# Altium PCB Mega2560_Custom.PcbDoc (part 4 of 6)
Units mil, origin at the board's own origin, x right, y up, seen from the top; angles counter-clockwise.
Board outline 4742.41 x 2889.95 mil, 2 copper layers (Top Layer, Bottom Layer), stack 57 mil thick; 213 components, 133 nets, 789 pads, 812 vias.
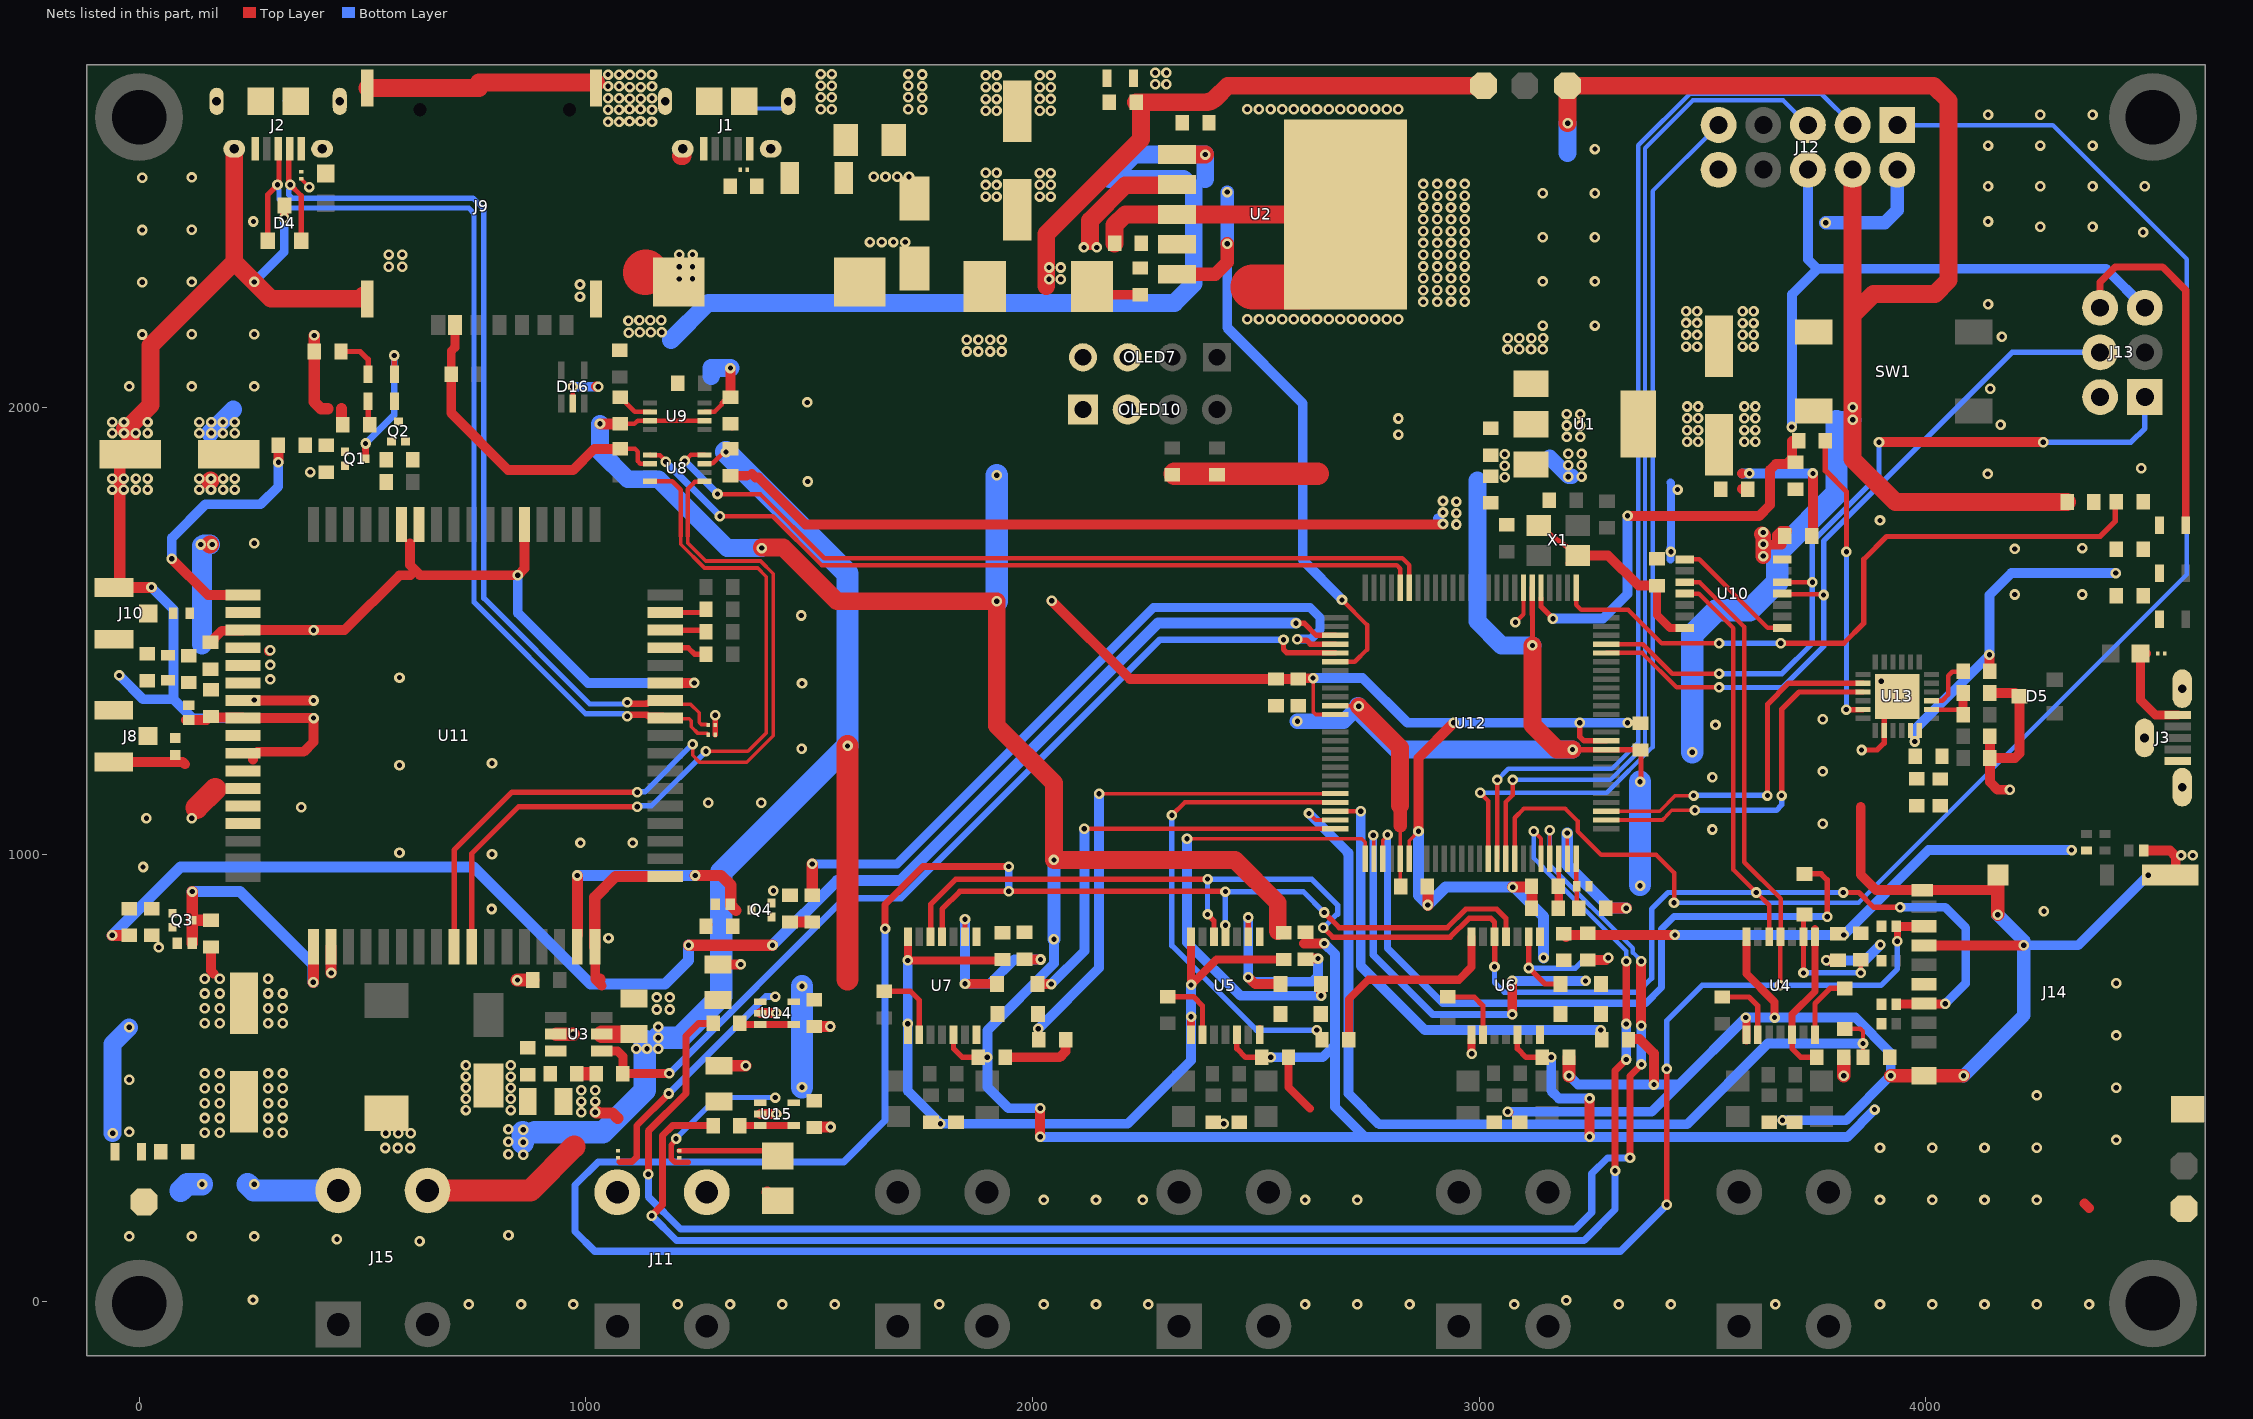
[diagram p2: the nets of this part, all layers, seen from the top]

## Part data (continued)
R48: library part RC0402FR-07100KL, "RES 100K OHM 1% 1/16W 0402", Case Code (Imperial)=0402, Case Code (Metric)=1005, Manufacturer=Yageo, Max Operating Temperature=155°C, Max Power Dissipation=63mW, Min Operating Temperature=-55°C, Package Quantity=1, Resistance=100kR, Resistance Tolerance=1%, Resistor Type="Thick Film", Supplier Part Number 1=603-RC0402FR-07100KL, Temperature Coefficient=100ppm/°C, Voltage Rating=50V, Case/Package=0402, Category="Chip SMD Resistors", ComponentLink1Description=https://datasheet.ciiva.com/11819/0900766b80c66297-11819452.pdf?src-supplier=RSComponents, ComponentLink1URL=https://datasheet.ciiva.com/11819/0900766b80c66297-11819452.pdf?src-supplier=RSComponents, ComponentLink2Description=https://datasheet.ciiva.com/22747/1018594-22747509.pdf?src-supplier=Element14, ComponentLink2URL=https://datasheet.ciiva.com/22747/1018594-22747509.pdf?src-supplier=Element14, ComponentLink3Description=https://datasheet.ciiva.com/2453/pyu-r-int-thick-7-2453362.pdf?src-supplier=Digi-Key, ComponentLink3URL=https://datasheet.ciiva.com/2453/pyu-r-int-thick-7-2453362.pdf?src-supplier=Digi-Key, ComponentLink4Description=https://datasheet.ciiva.com/2453/pyu-r-int-thick-7-2453363.pdf?src-supplier=Digi-Key, ComponentLink4URL=https://datasheet.ciiva.com/2453/pyu-r-int-thick-7-2453363.pdf?src-supplier=Digi-Key, ComponentLink5Description=https://datasheet.ciiva.com/2453/pyu-r-int-thick-7-2453361.pdf?src-supplier=Digi-Key, ComponentLink5URL=https://datasheet.ciiva.com/2453/pyu-r-int-thick-7-2453361.pdf?src-supplier=Digi-Key, ComponentLink6Description=https://datasheet.ciiva.com/12667/pyu-rc0402-51-rohs-l-6-r-12667930.pdf?src-supplier=Mouser, ComponentLink6URL=https://datasheet.ciiva.com/12667/pyu-rc0402-51-rohs-l-6-r-12667930.pdf?src-supplier=Mouser, ComponentLink7Description=https://datasheet.ciiva.com/15189/getdatasheetpartid-323696-15189334.pdf?src-supplier=Verical, ComponentLink7URL=https://datasheet.ciiva.com/15189/getdatasheetpartid-323696-15189334.pdf?src-supplier=Verical, Construction=Rectangular, Depth=0.5mm, Features="Moisture Resistant", Height=0.016inch, Lead Free="Lead Free", Length=0.039inch, Manufacturer Part Number=RC0402FR-07100KL, Military Standard=Not, Number of Terminations=2, Packaging="Tape and Reel", Power Rating=63mW, Pricing 1="1=0.10000, 10=0.01200, 50=0.01200, 100=0.00500, 1000=0.00300, 2500=0.00200, 10000=0.00100 (USD)", REACH SVHC="No SVHC", RoHS=Yes, RoHS Compliant=Yes, Series=RC, Stock 1=7759549, Supplier 1=Mouser, Technology="THICK FILM", Termination=SMD/SMT, Tolerance=1%, Width=0.02inch, Working Voltage=50V
R50: library part ARG06BTC2500, "±0.1% 250Ω 1206 Chip Resistor - Surface Mount ROHS", LCSC Part Number=C3033906, Manufacturer="Viking Tech", Package=1206, ComponentLink1Description=LCSC, ComponentLink1URL=https://www.lcsc.com/product-detail/Chip-Resistor-Surface-Mount_Viking-Tech-ARG06BTC2500_C3033906.html, Item Type=Resistor, Manufacturer Part Number=ARG06BTC2500
R51 R52: library part RC0603FR-07680RL, "RES SMD 680 OHM 1% 1/10W 0603", LCSC Part Number=C112310, Manufacturer=Yageo, Package=0603, ComponentLink4Description=LCSC, ComponentLink4URL=https://www.lcsc.com/product-detail/Chip-Resistor-Surface-Mount_YAGEO-RC0603FR-07680RL_C112310.html, Item Type=Resistor, Manufacturer Part Number=RC0603FR-07680RL
SB1 SB2: "Solder Bridge ON"
SB8: "Solder Bridge ON", Manufacturer Part Number="Solder Bridge", Item Type="Solder Bridge"
SW1: library part TL3301NF160QG, "SWITCH TACTILE SPST-NO 0.05A 12V", LCSC Part Number=C273526, Manufacturer=E-Switch, Manufacturer Part Number=TL3301NF160QG/TR, Package="SMD (6.00mm x 6.00mm)", ComponentLink1Description=LCSC, ComponentLink1URL=https://www.lcsc.com/product-detail/Tactile-Switches_E-Switch-TL3301NF160QG_C273526.html
U1: "15V 1.3V @ 800mA Fixed 3.3V SOT-223 Linear Voltage Regulators (LDO) ROHS", LCSC Part Number=C92102, Manufacturer="Diodes Incorporated", Package=SOT-223, ComponentLink1Description=LCSC, ComponentLink1URL=https://lcsc.com/product-detail/Linear-Voltage-Regulators-LDO_Diodes-Incorporated-AZ1117CH-3-3TRG1_C92102.html, Item Type=IC, Manufacturer Part Number=AZ1117CH-3.3TRG1
U2: "IC REG BUCK ADJ 3A TO263-5", Case/Package=TO-263, LCSC Part Number=C1355333, Manufacturer="TI National Semiconductor", Max Input Voltage=40V, Max Operating Temperature=125°C, Max Output current=3A, Max Output Voltage=37V, Min Input Voltage=4.5V, Min Operating Temperature=-40°C, Min Output Voltage=1.2V, Quiescent Current=5mA, Supplier Part Number 1=926-LM2596S-ADJ/NOPB, Switching Frequency=173kHz, Category="Voltage Regulators - Switching", ComponentLink1Description=https://datasheet.ciiva.com/27056/2051160-27056491.pdf?src-supplier=Jameco, ComponentLink1URL=https://datasheet.ciiva.com/27056/2051160-27056491.pdf?src-supplier=Jameco, ComponentLink2Description=https://datasheet.ciiva.com/15112/getdatasheetpartid-55559-15112636.pdf?src-supplier=Verical, ComponentLink2URL=https://datasheet.ciiva.com/15112/getdatasheetpartid-55559-15112636.pdf?src-supplier=Verical, ComponentLink3Description=https://datasheet.ciiva.com/41457/001013814-da-01-en-ic-reg-buc-lm2596s-adj-nopb-to-263-5-tid-41457756.pdf?src-supplier=Conrad, ComponentLink3URL=https://datasheet.ciiva.com/41457/001013814-da-01-en-ic-reg-buc-lm2596s-adj-nopb-to-263-5-tid-41457756.pdf?src-supplier=Conrad, ComponentLink4Description=https://datasheet.ciiva.com/22669/1874590-22669464.pdf?src-supplier=Element14, ComponentLink4URL=https://datasheet.ciiva.com/22669/1874590-22669464.pdf?src-supplier=Element14, ComponentLink5Description=https://datasheet.ciiva.com/14150/jqlm2596x-xx-e-14150653.pdf?src-supplier=Distrelec, ComponentLink5URL=https://datasheet.ciiva.com/14150/jqlm2596x-xx-e-14150653.pdf?src-supplier=Distrelec, ComponentLink6Description=https://datasheet.ciiva.com/6596/lm2596-6596342.pdf?src-supplier=Digi-Key, ComponentLink6URL=https://datasheet.ciiva.com/6596/lm2596-6596342.pdf?src-supplier=Digi-Key, Contact Plating=Tin,Matte, Efficiency=73%, Height=4.57mm, Item Type=IC, Lead Free="Contains Lead", Length=10.16mm, Manufacturer Part Number=LM2596S-ADJ/NOPB, Mount="Surface Mount", Number of Outputs=1, Number of Pins=5, Operating Supply Voltage=40V, Output Current=3A, Output Type=Adjustable, Output Voltage=37V, Packaging=Rail/Tube, Pricing 1="1=7.15000, 10=6.46000, 50=6.16000, 100=5.34000, 1000=5.10000, 10000=5.10000 (USD)", Radiation Hardening=No, Reach SVHC Compliant=Yes, RoHS=Yes, RoHS Compliant=Yes, Series=LM2596, Supplier 1=Mouser, Weight=0.056128oz, Width=8.64mm
U3: "boost converterType 1 Boost 28V 2V~24V 1.2MHz SOT-23-6 DC-DC Converters ROHS", LCSC Part Number=C84817, Manufacturer="XI'AN Aerosemi Tech", Package=SOT-23-6, ComponentLink1Description=LCSC, ComponentLink1URL=https://www.lcsc.com/product-detail/DC-DC-Converters_XI-AN-Aerosemi-Tech-MT3608_C84817.html, Item Type=IC, Manufacturer Part Number=MT3608
U4 U5 U6 U7: "IC CONV THERMOCOUPLE 14TSSOP", Case/Package=TSSOP, LCSC Part Number=C2653162, Manufacturer=Maxim, Max Operating Temperature=125°C, Min Operating Temperature=-55°C, Operating Supply Current=1.2mA, Category="Interface ICs", ComponentLink1Description=https://media.digikey.com/pdf/Data%20Sheets/Maxim%20PDFs/PartNumberBreakdown_ds.pdf?src-supplier=Digi-Key, ComponentLink1URL=https://media.digikey.com/pdf/Data%20Sheets/Maxim%20PDFs/PartNumberBreakdown_ds.pdf?src-supplier=Digi-Key, ComponentLink2Description=http://datasheets.maximintegrated.com/en/ds/MAX31856.pdf?src-supplier=Avnet, ComponentLink2URL=http://datasheets.maximintegrated.com/en/ds/MAX31856.pdf?src-supplier=Avnet, Interface=SPI, Item Type=IC, Manufacturer Part Number=MAX31856MUD+T, Mount="Surface Mount", Number of Pins=14, Output Type=Digital, Packaging="Tape and Reel", Pricing 1="1=10.21890, 10=9.52090, 25=9.06320, 100=7.80510, 250=7.38990, 500=6.66890, 1000=6.39750, 3000=6.32960 (USD)", RoHS=Yes, RoHS Compliant=Yes, Stock 1=2890, Supplier 1="Arrow Electronics", Supplier Part Number 1=MAX31856MUD+T
U8: "IC TRNSLTR BIDIRECTIONAL US8", Case/Package=VSSOP, High Level Output Current=-20uA, LCSC Part Number=C2677366, Low Level Output Current=20uA, Manufacturer="Texas Instruments", Max Operating Temperature=85°C, Max Supply Voltage=5.5V, Min Operating Temperature=-40°C, Min Supply Voltage=1.65V, Output Current=50mA, Package Quantity=1, Category="Integrated Circuits (ICs)", ComponentLink1Description=https://datasheet.ciiva.com/4226/sces641b-4226901.pdf?src-supplier=Arrow+Electronics, ComponentLink1URL=https://datasheet.ciiva.com/4226/sces641b-4226901.pdf?src-supplier=Arrow+Electronics, ComponentLink2Description=https://datasheet.ciiva.com/15096/getdatasheetpartid-226009-15096242.pdf?src-supplier=Verical, ComponentLink2URL=https://datasheet.ciiva.com/15096/getdatasheetpartid-226009-15096242.pdf?src-supplier=Verical, ComponentLink3Description=https://datasheet.ciiva.com/14287/txb0102-14287498.pdf?src-supplier=Avnet, ComponentLink3URL=https://datasheet.ciiva.com/14287/txb0102-14287498.pdf?src-supplier=Avnet, ComponentLink4Description=https://datasheet.ciiva.com/14287/txb0102-14287370.pdf?src-supplier=Avnet, ComponentLink4URL=https://datasheet.ciiva.com/14287/txb0102-14287370.pdf?src-supplier=Avnet, ComponentLink5Description=https://datasheet.ciiva.com/6619/txb0102-6619255.pdf?src-supplier=Digi-Key, ComponentLink5URL=https://datasheet.ciiva.com/6619/txb0102-6619255.pdf?src-supplier=Digi-Key, ComponentLink6Description=https://datasheet.ciiva.com/6619/txb0102-6619256.pdf?src-supplier=Digi-Key, ComponentLink6URL=https://datasheet.ciiva.com/6619/txb0102-6619256.pdf?src-supplier=Digi-Key, ComponentLink7Description=https://datasheet.ciiva.com/6619/txb0102-6619257.pdf?src-supplier=Digi-Key, ComponentLink7URL=https://datasheet.ciiva.com/6619/txb0102-6619257.pdf?src-supplier=Digi-Key, Contact Plating=Gold, Data Rate=100Mbps, Height=0.85mm, Item Type=IC, Lead Free="Lead Free", Length=2.3mm, Logic Function=Translator, Manufacturer Part Number=TXB0102DCUT, Mount="Surface Mount", Number of Bits=2, Number of Channels=2, Number of Inputs=2, Number of Pins=8, Output Type=3-STATE, Packaging="Tape and Reel", Pricing 1="1=0.79330, 10=0.66470, 25=0.65820, 250=0.37450, 500=0.36200, 1000=0.29770, 2500=0.28440 (USD)", Propagation Delay=31ns, Radiation Hardening=No, REACH SVHC="No SVHC", RoHS=Yes, RoHS Compliant=Yes, Series=-, Stock 1=10, Supplier 1="Arrow Electronics", Supplier Part Number 1=TXB0102DCUT, Turn-On Delay Time=7.4ns, Weight=0.000339oz, Width=2mm
U9: "IC TRANSLTR BIDIRECTIONAL 8VSSOP", Case/Package=VSSOP, LCSC Part Number=C53434, Manufacturer="Texas Instruments", Max Operating Temperature=85°C, Max Supply Voltage=3.6V, Min Operating Temperature=-40°C, Min Supply Voltage=1.65V, Nominal Supply Voltage=1.8V, Package Body Material=Plastic, Package Shape=Rectangular, Package Style="SMALL OUTLINE, VERY THIN PROFILE, SHRINK PITCHMeter", Peak Reflow Temperature (Cel)=260°C, Power Supplies=1.8/3.3,2.5/5V, Supplier Part Number 1=595-TXS0102DCUR, Supply Voltage1-Max=5.5V, Supply Voltage1-Min=2.3V, Supply Voltage1-Nom=2.5V, Temperature Grade=INDUSTRIAL, Category="Voltage Level Shifters", Channels=1, ComponentLink1Description=https://www.ti.com:443/lit/ds/symlink/txs0102.pdf?src-supplier=IHS+Markit, ComponentLink1URL=https://www.ti.com:443/lit/ds/symlink/txs0102.pdf?src-supplier=IHS+Markit, ComponentLink2Description=https://datasheet.ciiva.com/22653/1846850-22653373.pdf?src-supplier=Farnell, ComponentLink2URL=https://datasheet.ciiva.com/22653/1846850-22653373.pdf?src-supplier=Farnell, ComponentLink3Description=https://datasheet.ciiva.com/15096/getdatasheetpartid-118249-15096172.pdf?src-supplier=Verical, ComponentLink3URL=https://datasheet.ciiva.com/15096/getdatasheetpartid-118249-15096172.pdf?src-supplier=Verical, ComponentLink4Description=https://datasheet.ciiva.com/1508/1857232-1508821.pdf?src-supplier=Element14, ComponentLink4URL=https://datasheet.ciiva.com/1508/1857232-1508821.pdf?src-supplier=Element14, ComponentLink5Description=https://datasheet.ciiva.com/28499/1863639-28499676.pdf?src-supplier=Element14, ComponentLink5URL=https://datasheet.ciiva.com/28499/1863639-28499676.pdf?src-supplier=Element14, ComponentLink6Description=https://datasheet.ciiva.com/46395/1863639-46395871.pdf?src-supplier=Element14, ComponentLink6URL=https://datasheet.ciiva.com/46395/1863639-46395871.pdf?src-supplier=Element14, ComponentLink7Description=https://datasheet.ciiva.com/1899/txs0102-1899369.pdf?src-supplier=Digi-Key, ComponentLink7URL=https://datasheet.ciiva.com/1899/txs0102-1899369.pdf?src-supplier=Digi-Key, ComponentLink8Description=https://datasheet.ciiva.com/1899/txs0102-1899368.pdf?src-supplier=Digi-Key, ComponentLink8URL=https://datasheet.ciiva.com/1899/txs0102-1899368.pdf?src-supplier=Digi-Key, ComponentLink9Description=https://datasheet.ciiva.com/1899/txs0102-1899370.pdf?src-supplier=Digi-Key, ComponentLink9URL=https://datasheet.ciiva.com/1899/txs0102-1899370.pdf?src-supplier=Digi-Key, ComponentLink10Description=https://datasheet.ciiva.com/14287/txs0102-14287516.pdf?src-supplier=Avnet, ComponentLink10URL=https://datasheet.ciiva.com/14287/txs0102-14287516.pdf?src-supplier=Avnet, Height - Seated (Max)=0.9mm, Interface IC Type="INTERFACE CIRCUIT", Item Type=IC, JESD-30 Code=R-PDSO-G8, JESD-609 Code=e4, Length=2.3mm, Manufacturer Part Number=TXS0102DCUR, Moisture Sensitivity Level=1, Pins=8, Pricing 1="1=0.93000, 10=0.83300, 50=0.79000, 100=0.64900, 1000=0.42300, 10000=0.40900 (USD)", Qualification Status="Not Qualified", Reach SVHC Compliant=Yes, RoHS=Yes, RoHS Compliant=Yes, Stock 1=246792, Supplier 1=Mouser, Surface Mount=Yes, Terminal Finish=Nickel, Terminal Form="Gull Wing", Terminal Pitch=0.5mm, Terminal Position=DUAL, Width=2mm
U10: "IC TRANSLATOR BIDIR 14TSSOP", Case/Package=TSSOP, High Level Output Current=-20uA, LCSC Part Number=C60708, Low Level Output Current=20uA, Manufacturer="Texas Instruments", Max Operating Temperature=85°C, Max Supply Voltage=5.5V, Min Operating Temperature=-40°C, Min Supply Voltage=1.2V, Nominal Supply Current=5uA, Package Quantity=2000, Quiescent Current=3.5uA, Category="Voltage Level Shifters", Channel Type=Bidirectional, ComponentLink1Description=https://datasheet.ciiva.com/1508/1633692-1508723.pdf?src-supplier=Element14, ComponentLink1URL=https://datasheet.ciiva.com/1508/1633692-1508723.pdf?src-supplier=Element14, ComponentLink2Description=https://datasheet.ciiva.com/22653/1845221-22653354.pdf?src-supplier=Farnell, ComponentLink2URL=https://datasheet.ciiva.com/22653/1845221-22653354.pdf?src-supplier=Farnell, ComponentLink3Description=https://datasheet.ciiva.com/15096/getdatasheetpartid-48026-15096134.pdf?src-supplier=Verical, ComponentLink3URL=https://datasheet.ciiva.com/15096/getdatasheetpartid-48026-15096134.pdf?src-supplier=Verical, ComponentLink4Description=https://datasheet.ciiva.com/1508/1849862-1508724.pdf?src-supplier=Element14, ComponentLink4URL=https://datasheet.ciiva.com/1508/1849862-1508724.pdf?src-supplier=Element14, ComponentLink5Description=https://datasheet.ciiva.com/46395/1864432-46395886.pdf?src-supplier=Element14, ComponentLink5URL=https://datasheet.ciiva.com/46395/1864432-46395886.pdf?src-supplier=Element14, ComponentLink6Description=https://datasheet.ciiva.com/1899/txb0104-1899515.pdf?src-supplier=Digi-Key, ComponentLink6URL=https://datasheet.ciiva.com/1899/txb0104-1899515.pdf?src-supplier=Digi-Key, ComponentLink7Description=https://datasheet.ciiva.com/1899/txb0104-1899514.pdf?src-supplier=Digi-Key, ComponentLink7URL=https://datasheet.ciiva.com/1899/txb0104-1899514.pdf?src-supplier=Digi-Key, ComponentLink8Description=https://datasheet.ciiva.com/1899/txb0104-1899516.pdf?src-supplier=Digi-Key, ComponentLink8URL=https://datasheet.ciiva.com/1899/txb0104-1899516.pdf?src-supplier=Digi-Key, ComponentLink9Description=https://datasheet.ciiva.com/14287/txb0104-14287375.pdf?src-supplier=Avnet, ComponentLink9URL=https://datasheet.ciiva.com/14287/txb0104-14287375.pdf?src-supplier=Avnet, Data Rate=100Mbps, Height=1.15mm, Item Type=IC, Lead Free="Lead Free", Length=5mm, Logic Function=Translator, Manufacturer Part Number=TXB0104PWR, Mount="Surface Mount", Number of Bits=4, Number of Channels=4, Number of Circuits=1, Number of Inputs=4, Number of Pins=14, Output Current=20uA, Output Type=3-STATE, Packaging="Tape and Reel", Pricing 1="1=1.50780, 10=1.39060, 25=1.29340, 100=1.11370, 250=1.03790, 500=0.97230, 1000=0.92410 (USD)", Propagation Delay=31ns, Radiation Hardening=No, Reach SVHC Compliant=Yes, RoHS=Yes, RoHS Compliant=Yes, Series=-, Stock 1=1658, Supplier 1="Arrow Electronics", Supplier Part Number 1=TXB0104PWR, Turn-On Delay Time=7.4ns, Weight=0.002018oz, Width=4.4mm
U11: "eMTC CAT-M1 Module 700MHz/1700MHz/1900MHz 3.8V LCC", LCSC Part Number=C126271, Manufacturer=Simcom, Category=Uncategorized, ComponentLink1Description=LCSC, ComponentLink1URL=https://www.lcsc.com/product-detail/2G-3G-4G-5G-Modules_SIMCom-Wireless-Solutions-SIM7000A_C126271.html, Item Type=Module, Manufacturer Part Number=SIM7000A, Pricing 1="50=18.60000, 100=17.40000, 200=16.20000, 300=15.60000, 400=15.00000, 500=15.00000, 5000=14.64000 (USD)", RoHS=No, Supplier 1=Avnet, Supplier Part Number 1=SIM7000A
U12: "IC MCU 8BIT 256KB FLASH 100TQFP", Case/Package=A, Frequency=16MHz, LCSC Part Number=C22460, Manufacturer=Microchip, Max Operating Temperature=85°C, Max Supply Voltage=5.5V, Min Operating Temperature=-40°C, Min Supply Voltage=4.5V, Operating Supply Voltage=5V, Package Body Material=Plastic, Package Code=TFQFP, Package Quantity=90, Package Shape=Square, Peak Reflow Temperature (Cel)=260°C, Supplier Part Number 1=68T2776, Temperature Grade=INDUSTRIAL, Time @ Peak Reflow Temperature-Max (s)=40s, Access Time=16us, Category=Uncategorized, ComponentLink1Description=https://datasheet.ciiva.com/22651/1698622-22651116.pdf?src-supplier=Farnell, ComponentLink1URL=https://datasheet.ciiva.com/22651/1698622-22651116.pdf?src-supplier=Farnell, ComponentLink2Description=https://datasheet.ciiva.com/15122/getdatasheetpartid-134542-15122545.pdf?src-supplier=Verical, ComponentLink2URL=https://datasheet.ciiva.com/15122/getdatasheetpartid-134542-15122545.pdf?src-supplier=Verical, ComponentLink3Description=https://datasheet.ciiva.com/29119/154804-da-01-en-atmega2560-16au-tqfp-100-29119580.pdf?src-supplier=Conrad, ComponentLink3URL=https://datasheet.ciiva.com/29119/154804-da-01-en-atmega2560-16au-tqfp-100-29119580.pdf?src-supplier=Conrad, ComponentLink4Description=https://datasheet.ciiva.com/6640/atmel-2549-8-bit-avr-microcontroller-atmega640-1280-1281-2560-2561-summary-6640293.pdf?src-supplier=Digi-Key, ComponentLink4URL=https://datasheet.ciiva.com/6640/atmel-2549-8-bit-avr-microcontroller-atmega640-1280-1281-2560-2561-summary-6640293.pdf?src-supplier=Digi-Key, ComponentLink5Description=https://datasheet.ciiva.com/1162/33246-1162139.pdf?src-supplier=Farnell, ComponentLink5URL=https://datasheet.ciiva.com/1162/33246-1162139.pdf?src-supplier=Farnell, ComponentLink6Description=https://datasheet.ciiva.com/1157/1817551-1157521.pdf?src-supplier=Element14, ComponentLink6URL=https://datasheet.ciiva.com/1157/1817551-1157521.pdf?src-supplier=Element14, ComponentLink7Description=https://datasheet.ciiva.com/16936/70123980-16936268.pdf?src-supplier=Allied+Electronics, ComponentLink7URL=https://datasheet.ciiva.com/16936/70123980-16936268.pdf?src-supplier=Allied+Electronics, Core Architecture=AVR, Data Bus Width=8b, Density=256KB, Height=1.05mm, Interface=I2C,SPI,UART,USART,EBI/EMI,2-Wire, Item Type=IC, JESD-30 Code=S-PQFP-G100, Lead Free="Lead Free", Length=14.1mm, Manufacturer Part Number=ATMEGA2560-16AU, Max Frequency=16MHz, Memory Size=256KB, Memory Type=FLASH, Moisture Sensitivity Level=3, Mount="Surface Mount", Number of ADC Channels=16, Number of I2C Channels=1, Number of I/O Lines=86, Number of I/Os=86, Number of Pins=100, Number of Programmable I/O=86, Number of PWM Channels=12, Number of SPI Channels=1, Number of Terminals/Pins=100, Number of Timers/Counters=6, Oscillator Type=Internal, Packaging=Tray, Peripherals="PWM,Brown-out Detect/Reset,POR,WDT", Pricing 1="1=12.70000 (USD)", Radiation Hardening=No, RAM Size=8KB, Reach SVHC Compliant=Yes, RoHS=Yes, RoHS Compliant=Yes, Series="AVR® ATmega", Stock 1=4, Supplier 1=Avnet, Surface Mount=Yes, Technology=CMOS, Terminal Finish=Tin, Terminal Form="Gull Wing", Terminal Position=QUAD, Termination=SMD/SMT, Watchdog Timer=Yes, Width=14.1mm
U13: "IC USB TO UART BRIDGE QFN24", LCSC Part Number=C969151, Manufacturer="Silicon Labs", Category="Interface ICs", ComponentLink1Description=https://www.silabs.com/documents/public/data-sheets/cp2102n-datasheet.pdf?src-supplier=Digi-Key, ComponentLink1URL=https://www.silabs.com/documents/public/data-sheets/cp2102n-datasheet.pdf?src-supplier=Digi-Key, Item Type=IC, Manufacturer Part Number=CP2102N-A02-GQFN24R, Pricing 1="1=2.66900, 10=2.64300, 25=2.61700, 100=2.59000, 250=2.56400 (USD)", RoHS=Yes, Stock 1=321, Supplier 1="Arrow Electronics", Supplier Part Number 1=CP2102N-A02-GQFN24R
U14 U15: "IC OPAMP GP 1 CIRCUIT SC70-5", LCSC Part Number=C4366617, Manufacturer="Texas Instruments", Supplier Part Number 1=595-TLV9301IDCKR, Category="Amplifiers - Op Amps, Buffer, Instrumentation", Item Type=IC, Manufacturer Part Number=TLV9301IDCKR, Pricing 1="1=0.67, 10=0.562, 50=0.562, 100=0.445, 1000=0.284, 10000=0.283 (USD)", RoHS=No, Stock 1=29098, Supplier 1=Mouser
X1: "16MHz SMD Crystal Resonator 9pF ±10ppm ±30ppm -40℃~+85℃ SMD3225-4P Crystals ROHS", LCSC Part Number=C13738, Manufacturer="Yangxing Tech", Package=SMD3225-4P, ComponentLink1Description=LCSC, ComponentLink1URL=https://www.lcsc.com/product-detail/Crystals_Yangxing-Tech-X322516MLB4SI_C13738.html, Item Type=Crystal, Manufacturer Part Number=X322516MLB4SI

## Free pads (board coordinates)
  round 196.85 hole 122.05: MH(0,-5) MH(0,2650.77) MH(4508.05,2650.77) MH(4508.05,-5)

## Via types
v1: diameter 23.62, hole 11.81, Top Layer to Bottom Layer, 812 vias

## Nets (pads, with @x,y where several pads share a name; then routed paths per layer and width w, separated by ;. In a path a pad name is that pad's centre, name@x,y a point inside that pad or via, vN(x,y) a via of type N, cw(c..) or ccw(c..) an arc to the next point about the centre after c; other vN are vias at no path point)
3.3V: C6.1 C7.2 C9.2 C10.2 C12.2 C13.2 C19.2 C20.2 C21.2 C22.2 C30.1 C32.1 J14.4 OLED7.3 OLED10.2 P6.1 R8.2 R9.2 R14.2 R15.2 R36.2 R37.2 R48.2 U1.2 U1.4 U4.5 U4.8 U5.5 U5.8 U6.5 U6.8 U7.5 U7.8 U9.3 U9.6 U10.1 U10.8 | length 9087.4
  Top Layer w8: v1@3158,546 v1(3161,546) ; C30.1@3396.82,1664.95 C30.1@3401.05,1660.72
  Top Layer w10: C32.1@1076.82,1963.95 1108.82,1963.95 1115.98,1971.11 U9.3@1143.8,1971.11 U9.6@1265.85,1971.11 ; U10.1@3459.57,1660.72 3492.19,1660.72 3645.74,1507.18 U10.8@3678.07,1507.18
  Top Layer w12: U7.5@1823.23,596.91 1823.23,565.59 1842.82,546 C22.2@1878.82,546 ; U5.5@2457.41,596.91 2457.41,565.59 2477,546 C13.2@2513,546 ; U6.5@3085.27,596.91 3085.27,565.59 3104.86,546 C20.2@3140.86,546 ; U4.5@3700.27,583.91 3700.27,565.59 3719.86,546 C9.2@3755.86,546
  Top Layer w16: U4.5@3700.27,583.91 U4.5@3700.27,596.91 3700.27,642.27 3751.46,693.46 U4.8@3751.46,815.41 U4.8@3751.46,834.64
  Top Layer w22: v1(2017,368) v1(2017,432) ; 2608,801 v1(2653,801) ; C19.2@3194.52,815.5 3199.02,820 v1(3438,820) ; v1(3247,367.95) v1(3247,454) ; 4355.13,218.95 4365.13,208.95 ; P6.1@4575.82,208.95 P6.1@4577.82,206.95
  Top Layer w25: v1(1031.82,1963.95) C32.1@1076.82,1963.95
  Top Layer w40: v1@1394,1686.95 1442.05,1686.95 1562.05,1566.95 v1(1919.82,1566.95) 1919.82,1288.18 2048,1160 v1@2048,988 ; v1(2048,987.95) 2453,987.95 2549,891.95 C12.2@2549,829
  Top Layer w50: R36.2@2318,1852 2638.71,1852
  Bottom Layer w18: 3427.82,1660.72 v1@3427.82,1679.64 ; 3427.82,1832.95 3429,1831.77 3429,1687 3427.82,1685.82 v1@3427.82,1679.64 ; v1@3429,1679.64 v1@3427.82,1679.64
  Bottom Layer w22: v1(2017,368) 2017.05,367.95 2744.05,367.95 ; v1(2017,432) 1946,432 1898.96,479.04 v1(1898.96,546) 1898.96,606.63 2048,755.67 v1(2048,810) ; v1(2533.14,546) 2649,546 2655.5,552.5 ; v1(2653,801) 2677,777 2677,573 ; 2656,552 2677,573 ; v1(3161,546) 3161,471.14 3178.14,454 v1(3247,454) ; v1(3438,820) v1@3815.56,820 ; v1(3816,820) 4005.95,1009.95 v1(4325.82,1009.95) ; v1(3885,429) 3823.95,367.95 v1(3247,367.95) 2744.05,367.95 ; 2677,573 2677,435 2744.05,367.95
  Bottom Layer w30: v1(2048,810) v1(2048,987.95)
  Bottom Layer w40: v1(1031.82,1963.95) 1031.82,1902.18 1094.05,1839.95 1162.82,1839.95 1316.77,1686 v1(1394,1686)
  Bottom Layer w50: v1(1919.82,1566.95) v1(1919.82,1849)
  other v1: 3429,1677.64 3444,1817 3465.18,1923.82 3489.78,1923.82 3196,1934.67 3226,1934.67 2819,1940 3465.18,1949.82 3489.78,1949.82 3196,1960.33 3226,1960.33 2819,1976 3465.18,1976.82 3489.78,1976.82 3196,1986 3226,1986 3465.18,2002.82 3489.78,2002.82
5V: C1.2 C2.2 C3.2 C4.1 C31.1 C33.1 C45.1 C46.1 C47.1 C54.1 C61.2 Cx1.1 Cx2.1 FB1.2 FB10.1 J12.4 L1.1 P1.1 R38.2 R39.2 R40.2 R49.2 SB1.2 U1.3 U2.1 U3.5 U8.7 U9.7 U10.14 U12.10 U12.31 U12.61 U12.80 U14.5 U15.5 | length 11588.8
  Top Layer w8: U12.61@2677.67,1333.17 2678.26,1332.58 2729.42,1332.58 v1(2730,1332) ; U12.80@2823.34,991.31 2823.34,1063.66 ; U12.80@2823.67,990.98 U12.80@2823.34,990.65 2823.34,929.16 C46.1@2824,928.5
  Top Layer w10: U8.7@1265.85,1874.79 1266.75,1875.7 1284.36,1875.7 1313.82,1905.16 1313.82,1907.95 C54.1@1323.82,1907.95 1316.82,1900.95 v1(1313.82,1900.95) ; U9.7@1265.85,1990.79 1266.3,1991.24 1288.26,1991.24 1304,2006.98 1304,2011 1307.13,2014.13 1311.14,2014.13 C33.1@1320.96,2023.95 ; U12.80@2823.34,991.31 U12.80@2823.67,990.98
  Top Layer w12: U12.31@3118.62,1596.95 3119.1,1472 v1@3119.1,1471.9 ; v1(3208.82,1234.95) 3208.93,1234.84 U12.10@3283.97,1234.84 ; U12.10@3283.97,1234.74 3355.74,1234.74 3356,1235 3362,1229 v1@3362,1161 ; v1(3360,1163) v1@3362,1161 ; v1@3363,1159 3362,1160 v1@3362,1161
  Top Layer w22: C33.1@1323.82,2023.95 v1(1323.82,2088.95) ; 3655.2,1693.45 3677.32,1693.45 ; 3666.82,1695.45 3666.82,1714.95 3675.82,1723.95 C31.1@3688.82,1723.95
  Top Layer w29.53: 2821,1110 2823.34,1107.66 2823.34,1063.66
  Top Layer w35: v1@3632.5,1717 3636,1713.5 v1(3636,1694.5) v1(3636,1668)
  Top Layer w39.37: U3.5@1035.57,598 C3.2@1108,598 ; v1(2730,1332) 2823,1239
  Top Layer w40: C4.1@1965.82,2443.71 C4.1@1967.82,2445.71 ; U2.1@2323,2567 2323.19,2566.81 v1(2386.68,2566.81) ; 2823,1110 2823,1239 ; v1(3119,1468) 3119,1289.77 3173.82,1234.95 v1(3208.82,1234.95) ; v1(3197.82,2636.95) P1.1@3197.82,2720.95 4017.05,2720.95 4050.82,2687.18 4050.82,2285.82 4019.95,2254.95 3882.82,2254.95 3835.82,2207.95 ; J12.4@3835.82,2532.95 3835.82,2207.95 ; SB1.2@4315.82,1788.95 3931.82,1788.95 3835.82,1884.95 v1(3835.82,1972.95) v1(3835.82,2000.95) 3835.82,2207.95
  Top Layer w50: 1586,720.43 v1(1586,1243)
  Bottom Layer w35: v1(2593,1298) 2696,1298 v1(2730,1332) ; 3158,1889 3200.17,1846.83 v1@3207.17,1846.83
  Bottom Layer w40: 1190.82,2151.47 1274.3,2234.95 2317.95,2234.95 2361,2278 2361,2488.95 2338,2511.95 2172.18,2511.95 2227.04,2566.81 v1(2386.68,2566.81) 2386.68,2511.95 ; 1280.82,2070.95 1280.82,2088.95 v1(1323.82,2088.95) ; v1@2729,1333 v1(2730,1332) ; v1@2730,1321 2816.05,1234.95 v1(3208.82,1234.95) ; 2996,1837 2996,1522 3050,1468 v1(3119,1468) ; 3197.82,2570 v1(3197.82,2636.95) ; 3799.82,1969.95 3802.82,1972.95 v1(3835.82,1972.95)
  Bottom Layer w50: v1@858.82,354.95 v1@858.82,378.95 ; 885.82,377.95 1037.95,377.95 1132.32,472.32 1132.32,583 ; v1(1162,590) 1211,590 1303,682 1303,960 v1(1586,1243) 1586,1628.77 v1(1313.82,1900.95) ; v1(1484,479) v1(1484,705) ; v1@3360,932 v1(3360,1163) ; v1(3477,1229) 3477,1492 3532,1547 3605,1547 3667,1609 3667,1661 ; 3676.5,1684.5 3799.82,1807.82 3799.82,1969.95
  other v1: 859.82,327.95 826.82,328.95 551,343 579,343 607,343 859.82,355.95 826.82,356.95 552,376 580,376 608,376 859.82,383.95 826.82,384.95 1113,565 1137,565 1162,565 1162,614 3360,930 3636,1721 3057,1844.67 3199,1845.67 3229,1845.67 3057,1870.33 3199,1871.33 3229,1871.33 3057,1896 3199,1897 3229,1897 1096.38,2168.05 1121,2169 1145.6,2169 1170.2,2169 1095.38,2195.05 1120,2196 1144.6,2196 1169.2,2196 1895,2472.82 1919.6,2472.82 2016.4,2472.82 2041,2472.82 1895,2498.82 1919.6,2498.82 2016.4,2499.15 2041,2499.15 1895,2525.82 1919.6,2525.82 2016.4,2525.48 2041,2525.48
5VACC: C60.1 FB10.2 U12.100 | length 118.8
  Top Layer w10: C60.1@3217,875 C60.1@3218.04,876.04 ; FB10.2@3217.04,925.04 U12.100@3217.04,990.65 ; FB10.2@3218.22,929 3218.22,879.78 C60.1@3220,878
12V: C5.2 C53.1 D6.1 J15.2 P5.1 R4.2 R6.2 | length 264.2
  Bottom Layer w40: J15.2@444.82,246.95 J15.2@445.82,247.95
  Bottom Layer w50: 92.82,246.95 107.87,262 v1(141,262) v1(141,262) ; 242.72,262 256.77,247.95 443.82,247.95 J15.2@444.82,246.95
  other v1: 257.77,262.05 147.35,376.95 180.35,376.95 288.82,376.95 321.82,376.95 147.35,410.2 180.35,410.2 288.82,410.2 321.82,410.2 731.65,428 832,428 147.35,443.45 180.35,443.45 288.82,443.45 321.82,443.45 731.65,453 832,453 147.35,476.7 180.35,476.7 288.82,476.7 321.82,476.7 731.65,478 832,478 731.65,503 832,503 147.35,509.95 180.35,509.95 288.82,509.95 321.82,509.95 731.65,528 832,528
ADC0: Cx4.2 R51.2 U12.97 | length 3695.9
  Top Layer w8: U12.97@3157.99,990.65 v1(3157.99,1054.01)
  Top Layer w16: v1(1140,284) 1140,381 1224,465 1224,594 1252,622 R51.2@1285,622 ; v1(3337.41,320.95) 3337.41,504.41 v1(3363,530)
  Top Layer w22: v1@3362.41,623.59 v1(3362.41,761)
  Bottom Layer w10: v1(3157.99,1054.01) 3157.99,976.23 3344,790.21 3344,780.51 3362.41,762.11 v1(3362.41,761)
  Bottom Layer w16: v1(1140,284) 1140,234 1212,162 3214.87,162 3251.82,198.95 3251.82,285.82 3286.95,320.95 v1(3337.41,320.95)
  Bottom Layer w22: v1@3362.72,616.28 3362.72,530.28 v1(3363,530)
  other v1: 3362.41,616.59
ADC0/IN: D23.1 J11.2 U14.1 | length 549
  Top Layer w15: J11.2@1069,243.95 1069,240 J11.2@1071,238 ; 1076,312 1103,312 1114,323 1114,393 v1(1186,465)
  Bottom Layer w15: v1(1186,465) 1403,682 v1(1424,682)
ADC1: Cx3.2 R52.2 U12.96 | length 3533.4
  Top Layer w8: v1(3122,1052) 3138.3,1035.7 U12.96@3138.3,990.65
  Top Layer w16: v1(1147.46,191.46) 1172,216 1172,371 1194,393 R52.2@1285,393 ; v1(3304,291.95) 3304,516.11 v1(3329,541.11) ; v1@3329,627.59 v1(3329,761)
  Bottom Layer w10: v1(3122,1052) 3122,992 3143,971 ; 3135.71,977.29 3329,784 v1(3329,761)
  Bottom Layer w16: v1(1147.46,191.46) 1202.91,136 3234.87,136 3304,205.13 v1(3304,291.95)
  Bottom Layer w22: v1(3329,541.11) v1(3329,620.59)
ADC1/IN: D24.1 J11.4 R50.2 U15.1 | length 382.2
  Top Layer w12: v1(1202,364) 1202,360.86 1191,349.86 1191,320 1200,311 1229,311
  Top Layer w25: R50.2@1406.05,243.95 1425,225 R50.2@1430,225
  Bottom Layer w12: v1(1202,364) 1294,456 v1(1424,456)
AREF: C48.1 C62.1 U12.98 | length 133.3
  Top Layer w10: C48.1@3177,918 3177.67,918.67 U12.98@3177.67,990.65 ; C62.1@3178,880 3178,870 C62.1@3179,869
  Top Layer w20: C62.1@3178,880 C48.1@3178,929
BUFFER0: R51.1 U14.3 U14.4 | length 111
  Top Layer w15: R51.1@1354.41,619.41 U14.3@1390.6,619.41 U14.4@1465.4,619.41
BUFFER1: R52.1 U15.3 U15.4 | length 111.6
  Top Layer w15: R52.1@1354,393 1354.41,393.41 U15.3@1390.6,393.41 U15.4@1465.4,393.41
CP_VDD: C51.1 C52.1 R44.1 R45.2 R46.2 SB2.1 SB2.2 U13.5 U13.6 | length 738
  Top Layer w22: v1(4142,1447) 4142.31,1446.69 4142.31,1410.69 R44.1@4143,1410
  Bottom Layer w22: v1(3974.82,1252.95) 3974.82,1279.82 v1(4142,1447) 4142,1581 4191,1630 v1(4425,1630)
CS1: D8.1 U12.78 | length 1644.6
  Top Layer w8: U12.78@2783.97,990.65 2783.97,1032.05 2794.82,1042.9 v1(2794.82,1043.95)
  Top Layer w12: D8.1@3728,956.55 3765.45,956.55 3778.82,943.18 v1(3778.82,860.95)
  Bottom Layer w16: v1@2794,1046 2794.82,1045.18 v1(2794.82,1043.95) 2794.82,790.18 2918,667 3373,667 3408,702 3408,833 3435.95,860.95 v1(3778.82,860.95)
CS2: D12.1 U12.77 | length 929.8
  Top Layer w8: v1(2762.82,1042.95) 2763.55,1042.22 2763.55,991.38 U12.77@2764.29,990.65
  Top Layer w22: v1(3074,642) v1(3074,717)
  Bottom Layer w16: v1@2761,1046 2762.82,1044.18 v1(2762.82,1042.95) 2762.82,775.18 2896,642 v1(3074,642)
  Bottom Layer w22: v1(3074,717) v1(3238,717)
CS3: D9.1 U12.76 | length 1047.7
  Top Layer w8: v1@2345,1035 v1(2345.82,1035) 2736.77,1035 2744.6,1027.17 U12.76@2744.6,990.65
  Top Layer w22: v1(2646,684) D9.1@2646,710
  Bottom Layer w22: v1@2345.82,1036 v1(2345.82,1035) 2345.82,803.18 2465,684 v1(2646,684)
CS4: D13.1 U12.75 | length 970.9
  Top Layer w10: v1(2116,1057.58) U12.75@2677.67,1057.58
  Top Layer w22: D13.1@2011,710 v1(2042,710)
  Bottom Layer w22: v1(2042,710) 2116,784 v1(2116,1057.58)
D\R\D\Y\1\: D10.1 R12.2 U12.74 | length 2087.7
  Top Layer w10: v1(2618.82,1091.95) 2633.51,1077.26 U12.74@2677.67,1077.26 ; D10.1@3818,609.72 3853.14,609.72 3859,603.87 v1(3859,576.93) R12.2@3859,546
  Bottom Layer w22: v1(2618.82,1091.95) 2707,1003.77 ; 2704,1005 2707,1002 2707,465 2776,396 3464.87,396 3645.81,576.93 v1(3859,576.93)
D\R\D\Y\2\: D14.1 R18.2 U12.73 | length 998.8
  Top Layer w10: U12.73@2677.67,1096.95 v1@2731.82,1096.95
  Bottom Layer w22: v1@2734,1098 2734.82,1097.18 v1(2734.82,1096.95) 2734.82,750.18 2878,607 v1(3272,607)
D\R\D\Y\3\: D11.1 R13.2 U12.72 | length 1071.8
  Top Layer w10: v1(2312,1088) 2340.63,1116.63 U12.72@2677.67,1116.63
  Bottom Layer w12: v1(2312,1088) 2312,796 2501,607 v1(2636,607)
D\R\D\Y\4\: D15.1 R19.2 U12.71 | length 1110.7
  Top Layer w8: v1@2149,1135 2150,1136 U12.71@2677,1136
  Bottom Layer w22: v1(2013,610) 2149,746 v1(2149,1136)
FB_12V: R4.1 R5.2 U3.3
GND: C1.1 C2.1 C3.1 C4.2 C5.1 C6.2 C7.1 C8.2 C9.1 C10.1 C11.1 C12.1 C13.1 C14.1 C17.2 C18.2 C19.1 C20.1 C21.1 C22.1 C23.1 C24.1 C27.2 C28.2 C29.2 C30.2 C31.2 C32.2 C33.2 C34.1 C35.1 C36.2 C37.2 C38.2 C40.1 C41.1 C42.1 C43.2 C45.2 C46.2 C47.2 C48.2 C49.2 C50.2 C51.2 C52.2 C53.2 C54.2 C55.1 C60.2 C61.1 C62.2 Cx1.2 Cx2.2 Cx3.1 Cx4.1 D1.1 D2.1 D3.1 D4.3 D5.3 D7.2 D16.2 D17.2 D18.2 D19.1 D20.1 D21.2 D22.2 D23.2 D24.2 D25.2 D26.2 D27.2 D28.2 D29.2 J1.5 J1.MH1 J1.MH2 J1.MH3 J1.MH4 J1.MP1 J1.MP2 J2.5 J2.MH1 J2.MH2 J2.MH3 J2.MH4 J2.MP1 J2.MP2 J3.5 J3.SH1 J3.SH2 J3.SH3 J8.2 J8.3 J9.1 J9.2 J9.3 J9.4 J9.C5 J10.2 J10.3 J12.2 J12.10 J13.6 J14.6 J14.S1 J14.S2 J14.S3 J14.S4 J14.SW-B J15.4 LED1.2 LED2.2 LED6.2 OLED7.4 OLED10.1 Q1.2 Q2.2 Q3.2 Q4.2 R2.1 R3.1 R5.1 R12.1 R13.1 R18.1 R19.1 R28.2 R30.2 R32.2 R34.2 R43.2 R50.1 SW1.1 U1.1 U2.3 U2.6 U3.2 U4.1 U4.14 U5.1 U5.14 U6.1 U6.14 U7.1 U7.14 U8.2 U9.2 U10.7 U11.2 U11.17 U11.18 U11.29 U11.39 U11.45 U11.46 U11.54 U11.58 U11.59 U11.61 U11.62 U11.63 U11.64 U11.65 U12.11 U12.32 U12.62 U12.81 U12.99 U13.2 U13.25 U14.2 U15.2 X1.2 X1.4 | length 23092.9
  Top Layer w8: D2.1@363,2513.13 363.66,2513.13 363.72,2513.06 363.72,2511.28 v1(381,2494) ; v1(2628,1395) 2628,1319.77 2634.29,1313.48 U12.62@2677.67,1313.48 ; U12.81@2843.03,990.65 2843,1031 v1(2864,1052) ; v1(3197,1048) 3197.36,1047.64 U12.99@3197.36,990.65 ; U13.25@3906.29,1324.42 U13.25@3935.82,1353.95 ; J14.S2@4159.82,954.81 J14.S2@4160.87,953.76
  Top Layer w10: v1@970.82,2046.95 D16.2@970.82,2009.55 D16.2@972.71,2011.44 ; C29.2@1076.82,1907.95 1110.12,1907.95 1115.98,1902.09 1115.98,1880.65 1121.84,1874.79 U8.2@1143.8,1874.79 ; C32.2@1076.82,2023.95 1079.32,2023.95 1089.32,2013.95 1089.32,2011.45 1109.53,1991.24 1143.35,1991.24 U9.2@1143.8,1990.79 ; v1(3081,1520) 3099.03,1538.03 U12.32@3099.03,1597.04
  Top Layer w12: D24.2@1209.13,337 1418,337 R50.1@1430,325 ; D18.2@1290,1268 D17.2@1290,1290 v1(1290,1312) ; U12.32@3098.93,1596.95 U12.32@3099.03,1597.04 ; X1.2@3133.52,1736.41 3155.07,1718.79 3198.57,1687.11 X1.4@3220.13,1669.48 3216.19,1669.48 X1.4@3198.57,1651.86 ; v1@3224.82,1293.95 3224.82,1263.95 3234.34,1254.43 U12.11@3283.97,1254.43 ; v1(3855.82,1233.95) 3890.82,1233.95 3906.29,1249.42 U13.2@3906.29,1277.18 U13.25@3906.29,1324.42
  Top Layer w16: J13.6@4389.82,2223.95 4389.82,2280.95 4423.82,2314.95 4529.82,2314.95 4581.53,2263.24 LED6.2@4581.53,1737 ; J3.SH1@4573.67,1371.18 J3.SH1@4578.89,1376.41
  Top Layer w18: U7.14@1720.87,802.41 v1(1720.87,762.95) C21.1@1938.93,762.95 ; U5.1@2355.05,596.91 v1@2355.03,636.97 ; v1(2355,708) v1(2355,708) ; U5.14@2355.05,802.41 v1(2355,708) ; C12.1@2562,764.95 2411.95,764.95 v1(2355,708) ; C13.1@2573,546 2573,479 2621,431 ; R13.1@2708,585 2708,676 2751.69,719.69 2954.69,719.69 2982.91,747.91 U6.14@2982.91,815.41 ; v1(2983,554) U6.1@2983,585.24 ; C30.2@3397.94,1601.83 3397.94,1536.06 3426.82,1507.18 U10.7@3459.57,1507.18 ; v1@3597.77,632 3597.77,584.05 U4.1@3597.91,583.91 ; U4.14@3597.91,802.41 3597.91,733.09 3661,670 v1(3661,634.95)
  Top Layer w20: v1(325,2424) 325,2452.14 D4.3@325.6,2452.74 ; C34.1@698.82,2074.95 698.82,2126.95 707.13,2135.26 J9.C5@707.13,2185.45
  Top Layer w22: J8.3@-43.53,1206.88 97.89,1206.88 102.82,1201.95 ; D21.2@105,1301 105.17,1301.17 150.67,1301.17 158.5,1309 C37.2@161,1309 163.44,1306.56 231.62,1306.56 U11.59@232.82,1305.36 v1(390.56,1305.36) 390.56,1251.69 368.82,1229.95 264.82,1229.95 254.82,1219.95 254.82,1212.95 ; C38.2@160,1475 162.5,1475 166.5,1479 166.5,1482.08 185.43,1501 231.62,1501 U11.54@232.82,1502.21 v1(390.56,1502.21) 460.21,1502.21 582.95,1624.95 606.82,1624.95 607.82,1625.95 ; C41.1@161,793 161,740 167,734 ; U11.58@232.82,1344.73 v1(390.56,1344.73) ; 606.82,1696.45 606.82,1647.95 628.82,1625.95 ; 628.82,1624.95 v1(847.82,1624.95) 862.74,1639.87 U11.39@862.74,1738.43 ; C34.1@698.82,2074.95 698.82,1987.95 825.77,1861 971.87,1861 1018.82,1907.95 C29.2@1076.82,1907.95 ; U11.17@1020.22,793.55 1021.01,792.76 1021.01,721.18 1035.82,706.37 ; v1@1022.88,2047.7 v1@1023.19,2047.39 ; U11.29@1177.7,1384.1 v1(1242.67,1384.1) ; C40.1@1269,839 C40.1@1272.88,842.88 ; Cx4.1@1296,754 v1(1347,754) ; C54.2@1323.82,1847.95 1359.82,1847.95 ; C33.2@1323.82,1963.95 C33.2@1327.82,1959.95 ; 1372.05,1852 1380.05,1844 1387,1844 1492,1739 v1@2919,1739 ; U15.2@1390.6,419 v1(1426.6,419) ; U14.2@1390.6,645 v1(1426.6,645) ; C22.1@1938.82,546 2061,546 2073.89,558.89 2073.89,584.89 R19.1@2074,585 ; v1(2042.82,1567.95) 2217.82,1392.95 C61.1@2545,1392.95 C45.2@2595,1392.95 ; C45.2@2598,1390 C45.2@2595,1392.95 C45.2@2595,1392.95 ; v1(2628,1395) 2627.69,1394.69 2596.74,1394.69 C45.2@2595,1392.95 ; v1(2864,1052) 2864,1216 v1(2943,1295) ; v1@3064,423 v1@3066,423 ; C19.1@3187.55,764.22 C19.1@3188.82,762.95 ; X1.4@3220.13,1669.48 3288.52,1669.48 3356.17,1601.83 C30.2@3397.94,1601.83 ; R18.1@3334,585 3336,587 3359,587 3391,555 v1(3391,485) ; C7.1@3587.82,1817.95 C7.1@3588.51,1818.64 ; 3588.51,1852.64 3588.82,1852.95 ; C31.2@3744,1713 3747,1716 v1@3747,1852.2 ; v1@3777.31,762.69 C10.1@3804.26,762.69 ; C10.1@3802.26,763.69 C10.1@3803,762.95 ; 3853.82,1106.95 3853.82,954.95 3888.48,920.3 J14.SW-B@3991.58,920.3 4160.87,920.3 4164.48,920.3 ; J14.6@3995.52,796.28 4217.84,796.28 4218.56,797 v1(4219,797) ; C49.2@4143,1264.5 C50.2@4143,1216 ; R43.2@4143,1361.5 4199.93,1361.5 4207.48,1353.95 D5.3@4209.45,1353.95 4209.45,1226 4199.45,1216 C50.2@4143,1216 ; v1(4188,1145) 4160,1145 4143,1162 C50.2@4143,1216 ; D29.2@4487.73,1009 4546.11,1009 4559,996.11 4559,966.06 J14.S3@4546.7,953.76 v1(4497.76,953.76)
  Top Layer w25: C36.2@-43.18,1883 -43.18,1598.02 v1(27.89,1598.02) ; J2.MH2@210.28,2566.4 J2.MH2@213.03,2563.65 ; U11.2@429.67,793.55 429.97,793.25 v1@429.97,735.03 ; J9.2@509.79,2250.95 J9.2@509.79,2271 ; R30.2@613,1884 R30.2@614,1885 ; J9.C5@707.13,2185.45 J9.C5@708.81,2187.13 ; U11.17@1020.22,793.55 1020.22,904.35 1066.9,951.03 U11.18@1177.7,951.03 ; v1@1028,423 v1(1021,423) 1022.5,421.5 1059.57,421.5 1071.57,409.5 ; 1029.32,718.45 1031.82,720.95 ; Cx3.1@1298,527 v1(1358,527) ; Cx2.2@1511,389 1512,390 v1(1548,390) ; Cx1.2@1511,615 v1(1547,615) ; C46.2@2884,928.5 2885,927.5 v1(2885,887) v1@2885,886 ; v1(3075,927) 3115.5,927 C48.2@3118,924.5 ; C62.2@3118,875 C48.2@3118,924.5 ; C48.2@3118,929 C48.2@3118,924.5 ; C60.2@3283,880 v1(3329,880)
  Top Layer w30: v1(847,719) C35.1@881.48,719 ; U3.2@933.43,598 v1(972,598) ; R5.1@980,509 R3.1@1023,509 ; v1(3200.86,505) C20.1@3200.86,546 ; v1(3815.86,505) C9.1@3815.86,546 ; v1(3921,505) 3921.06,504.94 J14.S1@3995.52,504.94 v1@4083.22,504.94 ; v1@4160.87,866.06 4160.87,920.3 J14.S2@4160.87,953.76
  Top Layer w40: v1@-32,1953 -26.92,1953 26,2005.92 26,2139.43 213.03,2326.46 ; C36.2@-19.24,1896 -19.24,1953 ; C36.2@17.82,1889.82 C36.2@19.82,1887.82 ; J2.MH2@213.03,2563.65 213.03,2326.46 ; J9.2@501.91,2250.95 494.96,2244 295.49,2244 v1(257.77,2281.72) 213.03,2326.46 ; J9.3@511.07,2716.16 761.32,2716.16 ; 761.32,2728.45 J9.4@1022.88,2728.45 ; J1.MH2@1212.74,2563.65 J1.MH2@1217.03,2563.65 ; C4.2@1965.82,2664.18 C4.2@1967.82,2666.18 ; R2.1@2183.82,2367.95 2183.82,2408.95 2207.82,2432.95 U2.3@2323.07,2432.95 U2.6@2700.82,2432.95
  Top Layer w50: 129,1104.63 170.32,1145.95 ; J15.4@645.82,247.95 875.82,247.95 974,346.13
  Top Layer w100: 2493.22,2270.35 2613.22,2270.35 2700.82,2357.95 U2.6@2700.82,2432.95
  Bottom Layer w8: 325,2687.75 333.25,2696 ; J2.MH3@439.2,2696 J2.MH3@449.25,2685.95 ; 1366.63,2663.76 1372.82,2669.95 J1.MH3@1453.25,2669.95
  Bottom Layer w16: J3.SH1@4573.67,1356.92 J3.SH1@4573.67,1371.18
  Bottom Layer w20: v1(257.77,2281.72) 325,2348.95 v1(325,2424)
  Bottom Layer w22: v1(-44.18,1400.95) 9.13,1347.64 77.36,1347.64 ; v1(27.89,1598.02) 77.36,1548.56 77.36,1347.64 ; v1(390.56,1305.36) 390.15,1304.95 120.05,1304.95 77.36,1347.64 ; v1@847.82,1625.51 v1(847.82,1624.95) 847.82,1540.95 1004.67,1384.1 v1(1242.67,1384.1) ; v1(971,2046.95) v1(1027.88,2046.95) ; v1(1720.87,762.95) v1(1720.87,620.9) 1720.87,470.4 v1(1793.82,397.45) 2213.32,397.45 2355.05,539.18 2355.05,636.95 v1(2355,637) v1(2355,708) ; v1(2628,1395) 2739,1395 2839,1295 v1(2943,1295) ; 2907,1752 2918.82,1740.18 v1(2918.82,1739.95) ; v1@2944.82,1294.95 v1(3224.82,1294.95) v1(3331.95,1294.95) ; v1(3064,424) 3385.82,424 3446.82,485 ; v1(3200.86,505) 3220.86,485 v1(3391,485) 3446.82,485 ; 3588.82,1852.95 v1(3604.82,1852.95) v1(3747,1852.95) ; v1@3596.51,634.64 3446.87,485 3446.82,485 ; v1(3596.82,634.95) v1(3661,634.95) 3842.05,634.95 3921,556 v1(3921,505) 3921,504.94 3821.06,405 v1(3679,405) ; v1(3777,763) 3863,763 v1(3898,798) ; v1(4219,797) 4341,797 4497.23,953.23 4497.78,953.23 v1@4498,953.01
  Bottom Layer w25: v1(2864,1052) 2864,908 v1(2885,887) 2925,927 v1(3075,927) 3078,927 3144,861 v1(3144,769) ; v1(3197,1048) 3197,976 3293,880 v1(3329,880)
  Bottom Layer w30: v1(3775.82,2413.95) 3907.82,2413.95 3935.82,2441.95 J12.2@3935.82,2532.95 ; v1(4084.21,504.94) 4219,639.73 v1(4219,797) 4219,806.94 v1(4160.87,865.07)
  Bottom Layer w40: v1(-59.18,375.95) -59.18,576.11 v1(-22.23,613.05)
  other v1: 738.05,-7.23 855.05,-7.23 972.05,-7.23 1206.05,-7.23 1323.05,-7.23 1440.05,-7.23 1557.05,-7.23 1791.05,-7.23 2025.05,-7.23 2142.05,-7.23 2259.05,-7.23 2610.05,-7.23 2727.05,-7.23 2844.05,-7.23 3078.05,-7.23 3312.05,-7.23 3429.05,-7.23 3663.05,-7.23 3897.05,-7.23 4014.05,-7.23 4131.05,-7.23 4248.05,-7.23 4365.05,-7.23 3195.05,1.77 255,3 628,134 443,139 -22.23,145.05 117.77,145.05 257.77,145.05 827,148 2025.05,226.77 2142.05,226.77 2247.05,226.77 2610.05,226.77 2727.05,226.77 3897.05,226.77 4014.05,226.77 4131.05,226.77 4248.05,226.77 3897.05,343.77 4014.05,343.77 4131.05,343.77 4248.05,343.77 4426,361 -22.23,379.05 2427.82,397.45 990,423 990,447 1021,447 4248.05,460.77 990,472 1021,472 4426,478 -22.23,496.05 4426,595 147.35,622.42 180.35,622.42 288.82,622.42 321.35,622.42 1159,653 1188,653 147.35,655.67 180.35,655.67 288.82,655.67 321.35,655.67 1159,680 1188,680 147.35,688.92 180.35,688.92 288.82,688.92 321.35,688.92 4426,712 147.35,722.17 180.35,722.17 288.82,722.17 430,735 44,792 1050.82,812.95 4264,873 789,878 1420,919 9,972 4571,998 4597,998 790.02,1000.88 583,1004 988,1026 1105,1026 3522,1056 3769,1069 16.58,1081.42 117.77,1081.05 363,1106 1274,1116 1393,1116 3522,1173 3769,1186 583,1200 790.02,1204 1483,1237 3528.81,1290 3769,1303 257.77,1345.72 1484,1383 3900,1388 583,1396 1482,1535 4199,1582 4350,1582 4199,1684 4350,1686 257.77,1696.72 2949,1738.67 3897.05,1747.77 2949,1764.33 2918.82,1765.62 2949,1790 2918.82,1791.28 -60,1817 -34,1817 -7,1817 19,1817 1497,1835 -60,1841.6 -34,1841.6 -7,1841.6 19,1841.6 4138,1852 383,1856 4482.05,1864.77 3593.58,1923.82 3618.18,1923.82 -60,1943.4 -33.67,1943.4 -7.33,1943.4 19,1943.4 3593.58,1950.15 3618.18,1950.15 4167,1962 -60,1968 -33.67,1968 19,1968 3593.58,1976.48 3618.18,1976.48 3593.58,2002.82 3618.18,2002.82 1496,2012 4143.63,2042.37 -22.23,2047.72 117.77,2047.72 257.77,2047.72 1853,2126 1879,2126 1905,2126 1931,2126 3063.18,2131.18 3089.52,2131.18 3115.85,2131.18 3142.18,2131.18 3463,2137 3487.6,2137 3589.4,2137 3614,2137 1853,2152 1879,2152 1905,2152 1931,2152 3063.82,2155.82 3089.82,2155.82 3116.82,2155.82 3142.82,2155.82 4170,2159 3463,2163 3487.6,2163 3589.4,2163.33 3614,2163.33 7,2164 117.77,2164.72 257.77,2164.72 3142,2184 3259,2184 3463,2190 3487.6,2190 3589.4,2189.67 3614,2189.67 2480.82,2197.95 2506.82,2197.95 2532.82,2197.95 2558.82,2197.95 2584.82,2197.95 2610.82,2197.95 2636.82,2197.95 2662.82,2197.95 2688.82,2197.95 2714.82,2197.95 2740.82,2197.95 2766.82,2197.95 2792.82,2197.95 2818.82,2197.95 3463,2216 3487.6,2216 3589.4,2216 3614,2216 4139,2232 2874.82,2236.95 2905.82,2236.95 2936.82,2236.95 2967.82,2236.95 987,2248.95 2874.82,2263.37 2905.82,2263.37 2936.82,2263.37 2967.82,2263.37 987,2276 7,2281 117.77,2281.72 3142,2282.8 3259,2282.8 2874.82,2289.78 2905.82,2289.78 2936.82,2289.78 2967.82,2289.78 2874.82,2316.2 2905.82,2316.2 2936.82,2316.2 2967.82,2316.2 2874.82,2342.62 2905.82,2342.62 2936.82,2342.62 2967.82,2342.62 2874.82,2369.04 2905.82,2369.04 2936.82,2369.04 2967.82,2369.04 3142,2381.6 3259,2381.6 4486,2393 2874.82,2395.46 2905.82,2395.46 2936.82,2395.46 2967.82,2395.46 7,2398 117.77,2398.72 4256,2405 4373,2405 256,2417 4139,2417 2874.82,2421.88 2905.82,2421.88 2936.82,2421.88 2967.82,2421.88 2874.82,2448.29 2905.82,2448.29 2936.82,2448.29 2967.82,2448.29 2874.82,2474.71 2905.82,2474.71 2936.82,2474.71 2967.82,2474.71 3142,2480.4 3259,2480.4 4139,2496 4256,2496 4373,2496 4490,2496 2874.82,2501.13 2905.82,2501.13 2936.82,2501.13 2967.82,2501.13 7,2515 117.77,2515.72 1644.53,2517.05 1670.87,2517.05 1697.2,2517.05 1723.53,2517.05 3259,2579.2 4139,2587 4256,2587 4373,2587 1049.82,2639.95 1074.42,2639.95 1148.22,2639.95 1097.82,2640.95 1122.42,2640.95 4139,2656 4256,2656 4373,2656 1895,2665 1919.6,2665 2016.4,2665 2041,2665 1049.82,2666.95 1074.42,2666.95 1148.22,2666.95 1753,2667 1097.82,2667.95 1122.42,2667.95 1525.82,2667.95 1550.42,2667.95 1722,2668 2480.82,2667.95 2506.82,2667.95 2532.82,2667.95 2558.82,2667.95 2584.82,2667.95 2610.82,2667.95 2636.82,2667.95 2662.82,2667.95 2688.82,2667.95 2714.82,2667.95 2740.82,2667.95 2766.82,2667.95 2792.82,2667.95 2818.82,2667.95 1895,2691 1919.6,2691 2016.4,2691.33 2041,2691.33 1098.4,2692 1123,2692 1049.82,2692.95 1074.42,2692.95 1148.22,2692.95 1753,2694 1525.82,2694.95 1550.42,2694.95 1722,2695 1098.4,2718 1123,2718 1895,2718 1919.6,2718 2016.4,2717.67 2041,2717.67 1049.82,2719.95 1074.42,2719.95 1148.22,2719.95 1753,2720 1525.82,2720.95 1550.42,2720.95 1722,2721 2274.82,2723.95 2299.82,2723.95 1895,2744 1919.6,2744 2016.4,2744 2041,2744 1098.4,2745 1123,2745 1049.82,2745.95 1074.42,2745.95 1148.22,2745.95 1753,2746 1525.82,2746.95 1550.42,2746.95 1722,2747 2274.82,2749.95 2299.82,2749.95
GNSS_ANT: C39.2 J10.1 SB8.2
GSM_FB: R1.2 R2.2 U2.4
GSM_PWR: C8.1 C36.1 C37.1 C38.1 D21.1 L2.2 P4.1 R1.1 R7.2 R20.2 R25.2 R26.2 U11.55 U11.56 U11.57 | length 1897.6
  Top Layer w22: v1@290.82,1454.95 v1@290.82,1456.95 ; C8.1@2159.82,2252.95 R1.1@2240.82,2252.95
  Top Layer w25: v1(392,2162) R25.2@392,2126 392,2013.5 407.64,1997.86 423.14,1997.86 ; 453.5,1998.5 453.5,1961.5 R26.2@456,1959
  Top Layer w40: v1@158.82,1694.18 v1@159,1694 ; v1@159,1836 v1@160,1837 ; C36.1@212.82,1891.82 C36.1@214.82,1889.82 ; 2030.82,2272.95 2030.82,2388.82 2243,2601 2243,2661.71 ; R7.2@2232,2684 2386.42,2684 ccw(c2386.34,2716.97) 2409.63,2693.63 2436.95,2720.95 P4.1@3009.82,2720.95
  Top Layer w100: 1133.26,2302.95 1134.26,2303.95
  Bottom Layer w40: v1@158.82,1943.95 210.87,1996
  Bottom Layer w45: 141.27,1470.73 v1@141.27,1691.23 ; v1@141.27,1689.5 145.77,1694 v1@159,1694
  other v1: 293.82,1391.95 293.82,1424.45 293.82,1456.95 138,1694 164,1694 135,1817 161,1817 188,1817 214,1817 135,1841.6 161,1841.6 188,1841.6 214,1841.6 135,1943.4 161.33,1943.4 187.67,1943.4 214,1943.4 135,1968 161.33,1968 187.67,1968 214,1968 1209.18,2288.32 2037,2288 2063,2288 1239,2288.95 2037,2314 2063,2314 559.18,2316 589,2316 1209.18,2315.63 1239,2315.95 559.18,2343.05 589,2343.05 1209.18,2342.95 1239,2342.95
GSM_PWR_EN: R49.1 U2.5 U12.56 | length 1402.4
  Top Layer w10: U12.56@2677.67,1431.59 2721.59,1431.59 2748.82,1458.82 2748.82,1513.95 v1(2692.82,1569.95) v1@2692.82,1569.18
  Top Layer w30: U2.5@2323.07,2299.09 2408.96,2299.09 2435.82,2325.95 v1(2435.82,2366.95)
  Bottom Layer w22: v1(2435.82,2366.95) 2435.82,2179.18 2605,2010 2605,1658.82 2692.01,1571.81 2692.01,1571.2 2692.51,1570.7 v1@2692.82,1570.7 ; v1(2435.82,2482.95) 2435.82,2483.82 v1@2436,2484
  Bottom Layer w30: v1(2435.82,2366.95) v1(2435.82,2482.95)
GSM_RESET: R33.2 U12.54 | length 1630.5
  Top Layer w12: v1(2592.82,1481.95) 2595.05,1479.72 2613.05,1479.72 2621.81,1470.96 U12.54@2677.67,1470.96
  Top Layer w25: R33.2@1507,909 v1(1507,979)
  Bottom Layer w20: v1(1507,979) 1696.91,979 2270.91,1553 2621,1553 2644,1530 2644,1503.22 2622.73,1481.95 v1(2592.82,1481.95)
GSM_RX: U8.4 U11.10 | length 1751.8
  Top Layer w8: 1212.39,1712 1212.39,1694.61 1265.61,1641.39 1384.61,1641.39 1404,1622 1404,1272 1363,1231 v1(1269,1231)
  Top Layer w10: U8.4@1143.8,1835.42 1193.35,1835.42 1212.39,1816.38 1212.39,1712
  Top Layer w12: U11.10@744.63,793.55 744.63,1001.76 849.82,1106.95 v1(1115.45,1106.95) v1@1117.82,1106.95